# Altium PCB Solar_BMS.PcbDoc
Units mil, origin at the board's own origin, x right, y up, seen from the top; angles counter-clockwise.
Board outline 3690 x 1950 mil, 2 copper layers (Top Layer, Bottom Layer); 66 components, 54 nets, 227 pads, 0 vias.
Unrouted connection lines stored in the file: 132.
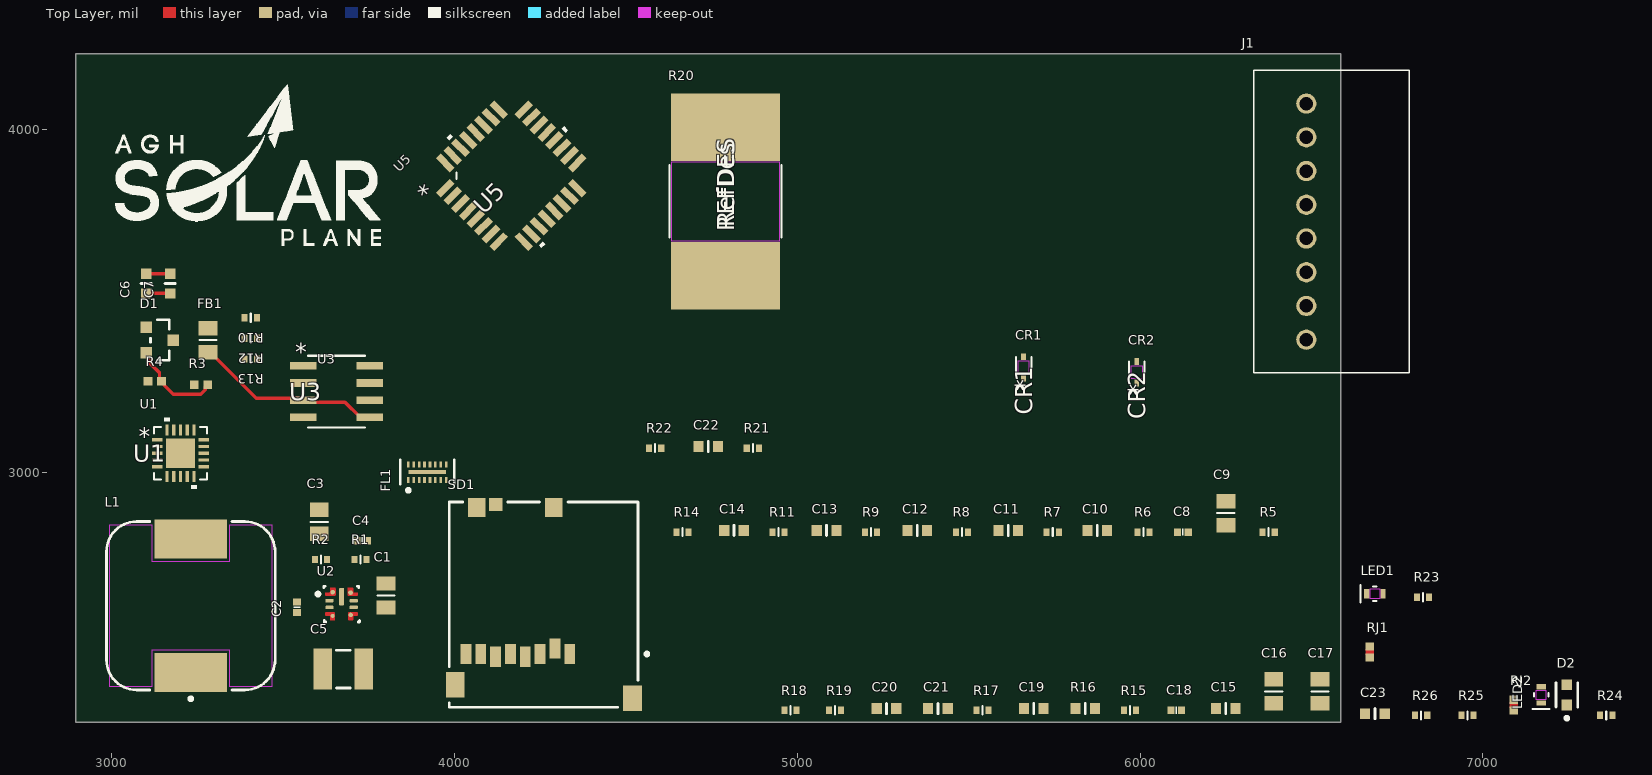
[diagram p0: Top Layer view]
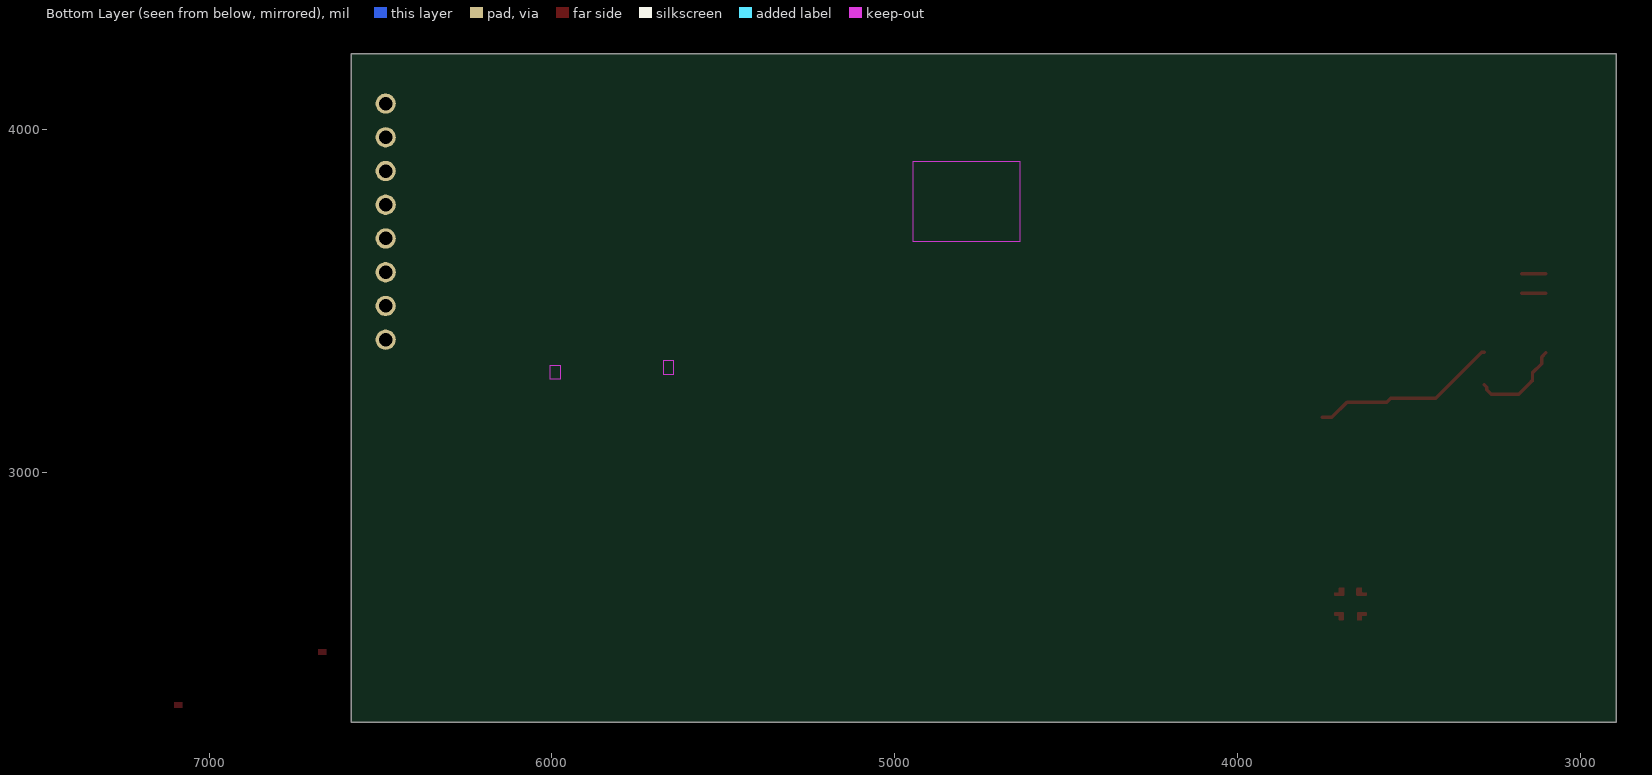
[diagram p1: Bottom Layer view, seen from below]

## Layer stack, top to bottom
Top Solder: solder mask 0.4, Solder Resist, Dk 3.5
Top Layer: signal copper 1.4
Dielectric 1: dielectric 12.6, FR-4, Dk 4.8
Bottom Layer: signal copper 1.4
Bottom Solder: solder mask 0.4, Solder Resist, Dk 3.5

## Board outline
2895,2270 2895,4220 6585,4220 6585,2270

## Design rules (kind name [scope] priority, off if disabled: settings)
Clearance [All] p1: gap=10 ignorepadtopadclearanceinfootprint=FALSE
PolygonConnect [All] p1: connectstyle=Relief reliefconductorwidth=10 reliefentries=4 polygonreliefangle="90 Angle" airgapwidth=10
RoutingVias [All] p1: holewidth=28 width=50 viastyle="Through Hole" minholewidth=28 minwidth=50 maxholewidth=28 maxwidth=50
SolderMaskExpansion [All] p1: expansion=0 istentingtop=FALSE
SupplyNets "Schematic Supply Nets_3" [InNet('VSS')] p1: voltage=0.000
SupplyNets "Schematic Supply Nets_2" [InNet('GND')] p2: voltage=0.000
SupplyNets "Schematic Supply Nets_1" [InNet('3v3')] p3: voltage=0.000
SupplyNets "Schematic Supply Nets" [InNet('VBAT')] p4: voltage=0.000
Width [All] p1: maxlimit=10 minlimit=10 preferedwidth=10
30 further rules are at their usual default settings.

## Classes and differential pairs
component class PowerSupply: C1 C2 C3 C4 C5 L1 LED1 R1 R2 R23 U2
component class Peripherals: C6 C7 C22 D1 FB1 FL1 R3 R21 R22 SD1 U3
component class MonitorSchDoc: C8 C9 C10 C11 C12 C13 C14 C15 C16 C17 C18 C19 C20 C21 CR1 CR2 J1 R4 R5 R6 R7 R8 R9 R10 R11 R12 R13 R14 R15 R16 R17 R18 R19 R20 RJ1 U1
component class MCU: C23 D2 LED2 R24 R25 R26 RJ2 U5

## Components (designator, comment, footprint, x,y, rotation, side; value= is the part's Value field where it differs from the comment)
C1 "Ceramic X7R" C_0805_2012 3800,2640 r90 top value=1uF
C2 "Ceramic X7R" C_0402_1005 3540,2605.35 r90 top value=100nF
C3 "Ceramic X7S" C_0805_2012 3605,2855 r90 top value=2.2uF
C4 "Ceramic X7R" C_0402_1005 3730,2800 r0 top value=100nF
C5 "Ceramic X7R" C_1210_3225 3675,2425 r0 top value=47uF
C6 "Ceramic X5R" C_0603_1608 3100,3550 r90 top value=22uF
C7 "Ceramic X7R" C_0603_1608 3170,3550 r90 top value=100nF
C8 "Ceramic C0G" C_0402_1005 6125,2825 r0 top value=100pF
C9 "Ceramic X7S" C_0805_2012 6250,2880 r90 top value=1uF
C10 "Ceramic X7R" C_0603_1608 5875,2830 r0 top value=220nF
C11 "Ceramic X7R" C_0603_1608 5615,2830 r0 top value=220nF
C12 "Ceramic X7R" C_0603_1608 5350,2830 r0 top value=220nF
C13 "Ceramic X7R" C_0603_1608 5085,2830 r0 top value=220nF
C14 "Ceramic X7R" C_0603_1608 4815,2830 r0 top value=220nF
C15 "Ceramic X7R" C_0603_1608 6250,2310 r0 top value=220nF
C16 "Ceramic X7S" C_0805_2012 6390,2360 r90 top value=1uF
C17 "Ceramic X7S" C_0805_2012 6525,2360 r90 top value=1uF
C18 "Ceramic C0G" C_0402_1005 6105,2305 r0 top value=100pF
C19 "Ceramic X7R" C_0603_1608 5690,2310 r0 top value=100nF
C20 "Ceramic X7R" C_0603_1608 5260,2310 r0 top value=220nF
C21 "Ceramic X7R" C_0603_1608 5410,2310 r0 top value=220nF
C22 "Ceramic X7R" C_0603_1608 4740,3075 r0 top value=10nF
C23 "Ceramic X7R" C_0603_1608 6685,2295 r0 top value=100nF
CR1 "ZHCS350TA" CR_350TA_DIO 5660,3305 r90 top
CR2 "ZHCS350TA" CR_350TA_DIO 5990,3291.44 r90 top
D1 "CDSOT23-SM712" FP-SOT23-MFG 3140,3385 r0 top value=75pF
D2 "VLMS1300-GS08" FP-6_541-5092_01-4-MFG 7245,2350 r90 top
FB1 "Ferrite bead" FB_0805_2012 3280,3385 r90 top value=11R@100M
FL1 "EMIF06-MSD02N16" FP-EMIF06-MSD02N16-MFG 3920,3000 r90 top
J1 "S8B-XH-A-1_LF__SN_" S8BXHA1LFSN 6485,3386.3 r90 top
L1 "Inductor" WE-PD_1210 3230,2610 r0 top value=33uH
LED1 "VLMTG1400-GS08" LED_400-GS08_VIS 6685,2645 r0 top
LED2 "VLMTG1400-GS08" LED_400-GS08_VIS 7170,2350 r90 top
R1 "Resistor" R_0402_1005 3725,2745 r0 top value=100k
R2 "Resistor" R_0402_1005 3610,2745 r0 top value=47k
R3 "Resistor 0R +/- 5% 0402 63 mW" RESC1005X40X25ML05T05 3260,3255 r0 top value=0
R4 "Resistor 0R +/- 5% 0402 63 mW" RESC1005X40X25ML05T05 3125,3265 r0 top value=0
R5 "Resistor" R_0402_1005 6375,2825 r0 top value=100R
R6 "Resistor" R_0402_1005 6010,2825 r0 top value=10R
R7 "Resistor" R_0402_1005 5745,2825 r0 top value=10R
R8 "Resistor" R_0402_1005 5480,2825 r0 top value=10R
R9 "Resistor" R_0402_1005 5215,2825 r0 top value=10R
R10 "Resistor" R_0402_1005 3405,3450 r180 top value=10k
R11 "Resistor" R_0402_1005 4945,2825 r0 top value=10R
R12 "Resistor" R_0402_1005 3405,3390 r180 top value=10k
R13 "Resistor" R_0402_1005 3405,3330 r180 top value=10k
R14 "Resistor" R_0402_1005 4665,2825 r0 top value=10R
R15 "Resistor" R_0402_1005 5970,2305 r0 top value=10R
R16 "Resistor" R_0603_1608 5840,2310 r0 top value=110k
R17 "Resistor" R_0402_1005 5540,2305 r0 top value=10R
R18 "Resistor" R_0402_1005 4980,2305 r0 top value=100R
R19 "Resistor" R_0402_1005 5110,2305 r0 top value=100R
R20 "LRMAP5930B-R0006FT" RES_R0006FT_WEL 4790,3790 r90 top
R21 "Resistor" R_0402_1005 4870,3070 r0 top value=62R
R22 "Resistor" R_0402_1005 4585,3070 r0 top value=62R
R23 "Resistor" R_0402_1005 6825,2635 r0 top value=1k
R24 "Resistor" R_0402_1005 7360,2290 r0 top value=330R
R25 "Resistor" R_0402_1005 6955,2290 r0 top value=330R
R26 "Resistor" R_0402_1005 6820,2290 r0 top value=100k
RJ1 "Net Tie 12x8mil" SHORT06-FP 6670,2475 r90 top net-tie
RJ2 "Net Tie 12x8mil" SHORT06-FP 7090,2320 r90 top net-tie
SD1 "473521001" MOLX-473521001_V 4259.53,2613.46 r0 top
U1 "BQ76907RGRR" VQFN20_RGR_TEX 3200,3055 r0 top
U2 "LMR36506RS3QRPERQ1" FP-RPE0009A-MFG 3670,2615 r0 top
U3 "TCAN3413DR" SOIC-8_D0008A_TEX 3655,3235 r0 top
U5 "STM32G431KBT3" LQFP-32_STM 4165,3865 r45 top

## Footprints (in the part's own frame and the unit in brackets; to place one, negate y for a bottom-side part, rotate by r counter-clockwise, add the part's x,y. Pads: shape width x height; smd on the part's side, far side on the other; paste and mask are expansions set on the pad)
C_0402_1005 [mm]
  rect 0.52x0.56 smd: 1(-0.39,0) 2(0.39,0)
  silkscreen extent 0,-0.25 0,0.25, body extent -0.52,-0.27 0.53,0.28, height 0.55
C_0603_1608 [mm]
  rect 0.75x0.8 smd: 1(-0.725,0) 2(0.725,0)
  silkscreen extent 0,-0.38 0,0.38, body extent -0.85,-0.45 0.85,0.45, height 0.89
C_0805_2012 [mil]
  rect 42x55 smd: 1(-35,0) 2(35,0)
  silkscreen extent 0,-25 0,25, body extent -43,-29 43,29, height 53
C_1210_3225 [mil]
  rect 54x120 smd: 1(-60,0) 2(60,0)
  silkscreen extent -20,-55 20,55, body extent -72,-55 70,55, height 106
CR_350TA_DIO [mil]
  rect 19.87x14 smd paste+0 mask+0: 1(-31.44,0) 2(31.44,0)
  Top Layer keep-out region: -19.5,-15.5 -19.5,15.5 19.5,15.5 19.5,-15.5
  Keep-Out Layer region: -19.5,-15.5 -19.5,15.5 19.5,15.5 19.5,-15.5
  silkscreen extent -30,-23 30,23, body extent -34,-17 34,17, height 26
FB_0805_2012 [mil]
  rect 42x55 smd: 1(-35,0) 2(35,0)
  silkscreen extent 0,-25 0,25, body extent -39,-24 39,24, height 35
FP-6_541-5092_01-4-MFG [mm]
  rect 0.8x0.8 smd paste+0 mask+0: 1(-0.75,0) 2(0.75,0)
  silkscreen extent -1.85,-0.8 0.9,0.8, body extent -1.25,-0.6 1.25,0.6, height 0.25
FP-EMIF06-MSD02N16-MFG [mm]
  rect 0.45x0.2 smd paste-1000 mask+0: 1(-0.575,1.4) 2(-0.575,1) 3(-0.575,0.6) 4(-0.575,0.2) 5(-0.575,-0.2) 6(-0.575,-0.6) 7(-0.575,-1) 8(-0.575,-1.4) 9(0.575,-1.4) 10(0.575,-1) 11(0.575,-0.6) 12(0.575,-0.2) 13(0.575,0.2) 14(0.575,0.6) 15(0.575,1) 16(0.575,1.4)
  rect 0.3x2.8 smd paste-1000 mask+0: 17(0,0)
  silkscreen extent -1.47,-2 0.9,2, body extent -0.9,-1.88 0.9,1.88, height 0.25
FP-RPE0009A-MFG [mm]
  round 0.342 smd paste-1000 mask+0: 1(-0.661,0.877)
  rrect40% 0.6x0.25 smd paste+0 mask+0: 2(-0.9,0.25) 3(-0.9,-0.25) 6(0.9,-0.25) 7(0.9,0.25)
  round 0.291 smd paste+0 mask+0: 4(-0.661,-0.877)
  round 0.323 smd paste+0 mask+0: 5(0.68,-0.805)
  round 0.346 smd paste-1000 mask+0: 8(0.665,0.841)
  rrect29% 0.35x1.3 smd paste-1000 mask+0: 9(0,0.55)
  Top Layer region: 1.2,0.8 1.193,0.825 1.175,0.844 1.15,0.85 1.15,0.85 0.9,0.851 0.881,0.854 0.865,0.865 0.854,0.881 0.85,0.901 0.85,0.901 0.85,1.15 0.843,1.175 0.825,1.193 0.8,1.2 0.8,1.2 0.5,1.2 0.481,1.196 0.465,1.185 0.454,1.169 0.45,1.15 0.45,1.15 0.45,0.676 0.454,0.656 0.465,0.64 0.481,0.629 0.5,0.626 0.5,0.625 1.15,0.626 1.169,0.629 1.185,0.64 1.196,0.656 1.2,0.676 1.2,0.676
  Top Layer region: 1.2,-0.8 1.193,-0.825 1.175,-0.844 1.15,-0.85 1.15,-0.851 0.9,-0.85 0.881,-0.854 0.865,-0.865 0.854,-0.881 0.85,-0.9 0.85,-0.901 0.85,-1.15 0.843,-1.175 0.825,-1.193 0.8,-1.2 0.8,-1.2 0.55,-1.2 0.531,-1.196 0.515,-1.185 0.504,-1.169 0.5,-1.15 0.5,-1.15 0.5,-0.676 0.504,-0.656 0.515,-0.64 0.531,-0.629 0.55,-0.625 0.55,-0.625 1.15,-0.626 1.169,-0.629 1.185,-0.64 1.196,-0.656 1.2,-0.676 1.2,-0.676
  Top Layer region: -1.2,-0.8 -1.193,-0.825 -1.175,-0.844 -1.15,-0.85 -1.15,-0.85 -0.9,-0.851 -0.881,-0.854 -0.865,-0.865 -0.854,-0.881 -0.85,-0.901 -0.85,-0.901 -0.85,-1.15 -0.843,-1.175 -0.825,-1.193 -0.8,-1.2 -0.8,-1.2 -0.55,-1.2 -0.531,-1.196 -0.515,-1.185 -0.504,-1.169 -0.5,-1.15 -0.5,-1.15 -0.5,-0.676 -0.504,-0.656 -0.515,-0.64 -0.531,-0.629 -0.55,-0.626 -0.55,-0.625 -1.15,-0.626 -1.169,-0.629 -1.185,-0.64 -1.196,-0.656 -1.2,-0.676 -1.2,-0.676
  Top Layer region: -1.2,0.8 -1.193,0.825 -1.175,0.844 -1.15,0.85 -1.15,0.851 -0.9,0.851 -0.881,0.854 -0.865,0.865 -0.854,0.881 -0.85,0.901 -0.85,0.901 -0.85,1.15 -0.843,1.175 -0.825,1.193 -0.8,1.2 -0.8,1.2 -0.5,1.2 -0.481,1.196 -0.465,1.185 -0.454,1.169 -0.45,1.15 -0.45,1.15 -0.45,0.676 -0.454,0.656 -0.465,0.64 -0.481,0.629 -0.5,0.626 -0.5,0.625 -1.15,0.626 -1.169,0.629 -1.185,0.64 -1.196,0.656 -1.2,0.676 -1.2,0.676
  silkscreen extent -1.87,-1.33 1.33,1.33, body extent -1.3,-1.3 1.3,1.3, height 0.25
FP-SOT23-MFG [mm]
  rect 0.85x0.85 smd paste+0 mask+0: 1(-1,0.95) 2(-1,-0.95) 3(1,0)
  silkscreen extent -0.7,-1.5 0.7,1.5, body extent -1.53,-1.6 1.53,1.6, height 0.25
LED_400-GS08_VIS [mil]
  rect 15.5x28 smd paste+0 mask+0: 1(-23.75,0) 2(23.75,0)
  Top Layer keep-out region: -14,-14 -14,14 14,14 14,-14
  silkscreen extent -42,-25 5,25, body extent -31,-16 31,16, height 22
LQFP-32_STM [mil]
  rect 58x20 smd paste-29 mask-29: 1(-162,110.24) 2(-162,78.74) 3(-162,47.24) 4(-162,15.75) 5(-162,-15.75) 6(-162,-47.24) 7(-162,-78.74) 8(-162,-110.24) 17(162,-110.24) 18(162,-78.74) 19(162,-47.24) 20(162,-15.75) 21(162,15.75) 22(162,47.24) 23(162,78.74) 24(162,110.24)
  rect 20x58 smd paste-29 mask-29: 9(-110.24,-162) 10(-78.74,-162) 11(-47.24,-162) 12(-15.75,-162) 13(15.75,-162) 14(47.24,-162) 15(78.74,-162) 16(110.24,-162) 25(110.24,162) 26(78.74,162) 27(47.24,162) 28(15.75,162) 29(-15.75,162) 30(-47.24,162) 31(-78.74,162) 32(-110.24,162)
  silkscreen extent -120,-211 211,211, body extent -177,-177 177,177, height 63
MOLX-473521001_V [mm] "SMD, 8-Leads, Body 15.2x14mm, Pitch 1.1mm"
  rect 0.8x1.5 smd: 1(1.94,-3.66) 2(0.84,-3.26) 3(-0.26,-3.66) 4(-1.36,-3.86) 5(-2.46,-3.66) 6(-3.56,-3.86) 7(-4.66,-3.66) 8(-5.76,-3.66)
  rect 1x0.95 smd: 9(-3.56,7.425)
  rect 1.3x1.4 smd: 10(-4.95,7.2) 11(0.75,7.2)
  rect 1.4x1.9 smd: 12(6.6,-6.95) 13(-6.55,-5.95)
  silkscreen extent -7,-7.6 7.78,7.6, body extent -7.05,-7.6 7.05,7.6, height 1.85
R_0402_1005 [mm] "Chip Resistor, 2-Leads, Body 1.00x0.50mm, IPC High Density"
  rect 0.45x0.55 smd: 1(-0.45,0) 2(0.45,0)
  silkscreen extent 0,-0.3 0,0.3, body extent -0.53,-0.28 0.53,0.28, height 0.37
R_0603_1608 [mm]
  rect 0.75x0.8 smd: 1(-0.725,0) 2(0.725,0)
  silkscreen extent 0,-0.38 0,0.38, body extent -0.87,-0.47 0.88,0.48, height 0.54
RES_R0006FT_WEL [mil]
  rect 197x319 smd paste+0 mask+0: 1(-216.5,0) 2(216.5,0)
  Keep-Out Layer region: -116,-156.5 -116,156.5 116,156.5 116,-156.5
  silkscreen extent -106,-164 106,164, body extent -301,-159 301,159, height 18
RESC1005X40X25ML05T05 [mm] "Chip Resistor, 2-Leads, Body 1.05x0.55mm, IPC Low Density"
  rect 0.65x0.65 smd: 1(-0.5,0) 2(0.5,0)
  body extent -0.53,-0.28 0.53,0.28, height 0.4
S8BXHA1LFSN [mm]
  round 1.5 hole 1: 1(0,0) 2(2.5,0) 3(5,0) 4(7.5,0) 5(10,0) 6(12.5,0) 7(15,0) 8(17.5,0)
  silkscreen extent -2.45,-7.62 19.95,3.9, body extent -2.45,-7.6 19.95,3.9, height 6.2
SHORT06-FP [mm]
  rect 0.6x0.6 smd paste-0.4 mask+0.102: 1(-0.4,0) 2(0.4,0)
  Top Layer region: -0.2,0.3 -0.2,-0.3 0.2,-0.3 0.2,0.3
SOIC-8_D0008A_TEX [mil]
  rect 78x22 smd paste+0 mask+0: 1(-97,75) 2(-97,25) 3(-97,-25) 4(-97,-75) 5(97,-75) 6(97,-25) 7(97,25) 8(97,75)
  silkscreen extent -84,-104 84,104, body extent -122,-99 122,99, height 69
VQFN20_RGR_TEX [mil]
  rect 31.81x10.03 smd paste+0 mask+0: 1(-67.91,39.38) 2(-67.91,19.69) 3(-67.91,0) 4(-67.91,-19.69) 5(-67.91,-39.38) 11(67.91,-39.38) 12(67.91,-19.69) 13(67.91,0) 14(67.91,19.69) 15(67.91,39.38)
  rect 10.03x31.81 smd paste+0 mask+0: 6(-39.38,-67.91) 7(-19.69,-67.91) 8(0,-67.91) 9(19.69,-67.91) 10(39.38,-67.91) 16(39.38,67.91) 17(19.69,67.91) 18(0,67.91) 19(-19.69,67.91) 20(-39.38,67.91)
  rect 85x85 smd paste+0 mask+0: 21(0,0)
  silkscreen extent -77,-104 77,104, body extent -72,-72 72,72, height 39
WE-PD_1210 [mm] "SMT Shielded Power Inductor, 2-leads, body 12x12mm"
  rect 5.4x2.9 smd: 1(0,-4.95) 2(0,4.95)
  Top Layer keep-out region: -6,6 -2.9,6 -2.9,3.3 2.9,3.3 2.9,6 6,6 6,-6 2.9,-6 2.9,-3.3 -2.9,-3.3 -2.9,-6 -6,-6
  silkscreen extent -6.25,-7.02 6.25,6.25, body extent -6,-6 6,6, height 9.46

## Part data
C1: library part C_1uF_50V_X7R_0805_10, "Capacitor", Dielectric=X7R, Manufacturer=AVX, Manufacturer Part Number=08055C105KAT2A, Tolerance (%)=10, Voltage=50V, HelpURL=https://sigma.octopart.com/147443767/technical_drawing/AVX-08055C105KAT2A.pdf, Part Number=C_1uF_50V_X7R_0805_10, SCH_Footprint=0805, Supplier 1=TME, Supplier 2="RS Components", Supplier 3=Farnell, Supplier 4=Mouser, Supplier 5=Digi-Key, Supplier 6=LCSC, Supplier Part Number 1=08055C105KAT2A, Supplier Part Number 2=1441427, Supplier Part Number 3=2094043, Supplier Part Number 4=581-08055C105KAT2A, Supplier Part Number 5=478-7956-1-ND
C2 C4: library part C_100nF_50V_X7R_0402_10, "Capacitor", Dielectric=X7R, Manufacturer=Murata, Manufacturer Part Number=GRM155R71H104KE14D, Tolerance (%)=10, Voltage=50V, HelpURL=http://docs-europe.electrocomponents.com/webdocs/145f/0900766b8145f9d2.pdf, Part Number=C_100nF_50V_X7R_0402_10, SCH_Footprint=0402, Supplier 1=TME, Supplier 2="RS Components", Supplier 3=Farnell, Supplier 4=Mouser, Supplier 5=Digi-Key, Supplier 6=LCSC, Supplier Part Number 1=GRM155R71H104KE14D, Supplier Part Number 2=8847087, Supplier Part Number 3=2611912, Supplier Part Number 4=81-GRM155R71H104KE4D, Supplier Part Number 5=490-10700-1-ND
C3: library part C_2.2uF_35V_X7S_0805_10_AECQ1, "Capacitor", Dielectric=X7S, Manufacturer=Murata, Manufacturer Part Number=GCM21BC7YA225KE02, Supplier Part Number 1=GCM21BC7YA225KE02L, Tolerance (%)=10, Voltage=35V, AEC-Q=1, HelpURL=https://www.murata.com/products/productdetail?partno=GCM21BC7YA225KE02%23, Part Number=C_2.2uF_35V_X7S_0805_10_AECQ1, SCH_Footprint=0805, Supplier 1=TME, Supplier 2="RS Components", Supplier 3=Farnell, Supplier 4=Mouser, Supplier 5=Digi-Key, Supplier 6=LCSC, Supplier Part Number 3=3784380, Supplier Part Number 4=81-GCM21BC7YA225KE2L, Supplier Part Number 5=490-16390-1-ND, Supplier Part Number 6=C389007
C5: library part C_47uF_10V_X7R_1210_20, "Capacitor", Dielectric=X7R, Manufacturer=Murata, Manufacturer Part Number=GRM32ER71A476ME15L, Tolerance (%)=20, Voltage=10V, HelpURL=http://www.mouser.com/ds/2/281/c02e-2905.pdf, Part Number=C_47uF_10V_X7R_1210_20, SCH_Footprint=1210, Supplier 1=TME, Supplier 2="RS Components", Supplier 3=Farnell, Supplier 4=Mouser, Supplier 5=Digi-Key, Supplier 6=LCSC, Supplier Part Number 1=GRM32ER71A476ME15L, Supplier Part Number 2=8202908, Supplier Part Number 3=2362130, Supplier Part Number 4=81-GRM32ER71A476ME5L, Supplier Part Number 5=490-6543-1-ND
C6: library part C_22uF_10V_X5R_0603_20, "Capacitor", Dielectric=X5R, Manufacturer=Murata, Manufacturer Part Number=GRM188R61A226ME15D, Tolerance (%)=20, Voltage=10V, HelpURL=https://www.mouser.pl/datasheet/2/281/1/GRM188R61A226ME15_02A-1985787.pdf, Part Number=C_22uF_10V_X5R_0603_20, SCH_Footprint=0603, Supplier 1=TME, Supplier 2="RS Components", Supplier 3=Farnell, Supplier 4=Mouser, Supplier 5=Digi-Key, Supplier 6=LCSC, Supplier Part Number 1=GRM188R61A226ME15D, Supplier Part Number 3=2426957, Supplier Part Number 4=81-GRM188R61A226ME5D, Supplier Part Number 5=490-10476-1-ND
C7 C23: library part C_100nF_50V_X7R_0603_10_AECQ1, "Capacitor", Dielectric=X7R, Manufacturer=Murata, Manufacturer Part Number=GCM188R71H104KA57D, Tolerance (%)=10, Voltage=50V, AEC-Q=1, HelpURL=https://www.murata.com/products/productdetail?partno=GCM188R71H104KA57%23, Part Number=C_100nF_50V_X7R_0603_10_AECQ1, SCH_Footprint=0603, Supplier 1=TME, Supplier 2="RS Components", Supplier 3=Farnell, Supplier 4=Mouser, Supplier 5=Digi-Key, Supplier 6=LCSC, Supplier Part Number 1=GCM188R71H104KA57D, Supplier Part Number 3=4360223, Supplier Part Number 4=81-GCM188R71H104KA7D, Supplier Part Number 5=490-4779-1-ND, Supplier Part Number 6=C85864
C8 C18: library part C_100pF_50V_C0G_0402_5, "Capacitor", Dielectric=C0G, Manufacturer=Murata, Manufacturer Part Number=GRM1555C1H101JA01D, Tolerance (%)=5, Voltage=50V, HelpURL=http://www.tme.eu/en/Document/e3e731e59cc68b1ab6d46b158bb05733/MURATA_GRM.pdf, Part Number=C_100pF_50V_C0G_0402_5, SCH_Footprint=0402, Supplier 1=TME, Supplier 2="RS Components", Supplier 3=Farnell, Supplier 4=Mouser, Supplier 5=Digi-Key, Supplier 6=LCSC, Supplier Part Number 1=GRM1555C1H101JA01D, Supplier Part Number 2=7235363, Supplier Part Number 3=2218836, Supplier Part Number 4=81-GRM1555C1H101JA1D, Supplier Part Number 5=490-5922-1-ND
C9 C16 C17: library part C_1uF_100V_X7S_0805_10_AECQ1, "Capacitor", Dielectric=X7S, Manufacturer=Murata, Manufacturer Part Number=GCM21BC72A105KE36, Supplier Part Number 1=GCM21BC72A105KE36L, Tolerance (%)=10, Voltage=100V, AEC-Q=1, HelpURL=https://www.murata.com/products/productdetail?partno=GCM21BC72A105KE36%23, Part Number=C_1uF_100V_X7S_0805_10_AECQ1, SCH_Footprint=0805, Supplier 1=TME, Supplier 2="RS Components", Supplier 3=Farnell, Supplier 4=Mouser, Supplier 5=Digi-Key, Supplier 6=LCSC, Supplier Part Number 3=3243166, Supplier Part Number 4=81-GCM21BC72A105KE6L, Supplier Part Number 5=490-14436-1-ND, Supplier Part Number 6=C126585
C10 C11 C12 C13 C14 C15 C20 C21: library part C_220nF_50V_X7R_0603_10_AECQ1, "Capacitor", Dielectric=X7R, Manufacturer=Murata, Manufacturer Part Number=GCM188R71H224KA64J, Tolerance (%)=10, Voltage=50V, AEC-Q=1, HelpURL=https://www.murata.com/products/productdetail?partno=GCM188R71H224KA64%23, Part Number=C_220nF_50V_X7R_0603_10_AECQ1, SCH_Footprint=0603, Supplier 1=TME, Supplier 2="RS Components", Supplier 3=Farnell, Supplier 4=Mouser, Supplier 5=Digi-Key, Supplier 6=LCSC, Supplier Part Number 1=GCM188R71H224KA64J, Supplier Part Number 3=3790391, Supplier Part Number 4=81-GCM188R71H224KA4J, Supplier Part Number 5=490-13307-1-ND, Supplier Part Number 6=C2169489
C19: library part C_100nF_100V_X7R_0603_10, "Capacitor", Dielectric=X7R, Manufacturer=Kemet, Manufacturer Part Number=C0603X104K1RACTU, Tolerance (%)=10, Voltage=100V, HelpURL=https://www.mouser.pl/datasheet/2/447/KEM_C1013_X7R_FT_CAP_SMD-3316633.pdf, Part Number=C_100nF_100V_X7R_0603_10, SCH_Footprint=0603, Supplier 1=TME, Supplier 2="RS Components", Supplier 3=Farnell, Supplier 4=Mouser, Supplier 5=Digi-Key, Supplier 6=LCSC, Supplier Part Number 3=4380077, Supplier Part Number 4=80-C0603X104K1RACTU, Supplier Part Number 5=399-C0603X104K1RACTUCT-ND
C22: library part C_10nF_100V_X7R_0603_10_AECQ1, "Capacitor", Dielectric=X7R, Manufacturer=Murata, Manufacturer Part Number=GCM188R72A103KA37J, Tolerance (%)=10, Voltage=100V, AEC-Q=1, HelpURL=https://www.murata.com/products/productdetail?partno=GCM188R72A103KA37%23, Part Number=C_10nF_100V_X7R_0603_10_AECQ1, SCH_Footprint=0603, Supplier 1=TME, Supplier 2="RS Components", Supplier 3=Farnell, Supplier 4=Mouser, Supplier 5=Digi-Key, Supplier 6=LCSC, Supplier Part Number 1=GCM188R72A103KA37J, Supplier Part Number 3=3790392, Supplier Part Number 4=81-GCM188R72A103KA7J, Supplier Part Number 5=490-8028-1-ND
CR1 CR2: "Description", Manufacturer_Name="Diodes Inc", Copyright="Copyright (C) 2026 Ultra Librarian. All rights reserved.", Manufacturer_Part_Number=ZHCS350TA
D1: library part CMP-2000-05081-2, "TVS DIODE 7V/12V 14V/26V SOT23-3", Breakdown Voltage=7.5V, Capacitance=75pF, Clamping Voltage=26V, Manufacturer="Bourns Inc.", Package=SOT23, Peak Pulse Current=17A, Peak Pulse Power=400W, Reverse Standoff Voltage=12V, Temperature="-55°C to +150°C", Temperature Range High=+150°C, Temperature Range Low=-55°C, Automotive=No, Category=Diode, ComponentLink2Description=Datasheet, ComponentLink2URL=https://www.bourns.com/docs/Product-Datasheets/CDSOT23-SM712.pdf, Device Class L1="Circuit Protection", Device Class L2="TVS Diodes", Device Class L3=unset, Digikey Description="TVS DIODE 7V/12V 14V/26V SOT23-3", Direction=Bidirectional, Height=1.17mm, Ipc Land Pattern Name=SOT95P229X103-3, Lead Free=Yes, Manufacturer Part Number=CDSOT23-SM712, Mouser Description="Transient Voltage Suppressor, TVS, CDSOT23 Series, Unidirectional, 12 V, SOT-23, 3, 13.3 V", Number Of Channels=2, Octopart=https://octopart.com/cdsot23-sm712-bourns-7576327, RoHS=TRUE, Standoff Height=0.05mm
D2: library part CMP-02520-000012-1, "LED RED 0603 SMD", Ambient Temperature Range High=+85°C, Ambient Temperature Range Low=-35°C, Colour=Red, Forward Current=20mA, Forward Voltage=2V, Manufacturer=Vishay, Package=6.541-5092.01-4, Power Dissipation=75mW, Reverse Voltage=5V, Temperature="-35°C to +85°C", Automotive=No, Category=Diode, ComponentLink2Description=Datasheet, ComponentLink2URL=http://www.vishay.com/docs/82437/vlmo1300.pdf, Device Class L1=Optoelectronics, Device Class L2=LEDs, Device Class L3=unset, Digikey Description="LED RED 0603 SMD", Height=1mm, Lead Free=Yes, Led Orientation="Top View", Luminous Intensity=54mcd, Manufacturer Part Number=VLMS1300-GS08, Mouser Description="Standard LEDs - SMD Super Red Clear Non-Diff", Octopart=https://octopart.com/vlms1300-gs08-vishay-21709201, Peak Emmision Wavelength=639nm, RoHS=TRUE, Temperature Range High=+85°C, Temperature Range Low=-35°C, Viewing Angle=130°, Wavelength=631nm
FB1: library part FB_2508051107Y0, "Ferrite Bead", Current=300mA, Manufacturer=Fair-Rite, Manufacturer Part Number=2508051107Y0, Resistance=100mR, HelpURL=https://datasheet.octopart.com/2508051107Y0-Fair-Rite-datasheet-834.pdf, Part Number=FB_2508051107Y0, SCH_Footprint=0805, Supplier 1=TME, Supplier 2="RS Components", Supplier 3=Farnell, Supplier 4=Mouser, Supplier 5=Digi-Key, Supplier 6=LCSC, Supplier Part Number 3=1612004, Supplier Part Number 4=623-2508051107Y0, Supplier Part Number 5=1934-1397-1-ND
FL1: library part CMP-12221-000004-1, "FILTER RC(PI) 45 OHM/20PF SMD", Breakdown Voltage=8V, Capacitance=20pF, Case/Package=QFN, Max Operating Temperature=85°C, Min Operating Temperature=-30°C, Package Quantity=1, Contact Plating=Gold, Depth=1.25mm, ESD Protection=Yes, Height=0.022inch, Lead Free="Lead Free", Length=3.55mm, Max Breakdown Voltage=8V, Mount="Surface Mount", Number Of Channels=6, Number of Pins=16, Packaging="Tape and Reel", Radiation Hardening=No, REACH SVHC="No SVHC", Termination=Flat, Width=0.047inch
J1: "Connector", Arrow Part Number=S8B-XH-A-1(LF)(SN), Manufacturer_Name="JST (JAPAN SOLDERLESS TERMINALS)", Mouser Part Number=306-S8BXHA1LFSN, Arrow Price/Stock=https://www.arrow.com/en/products/s8b-xh-a-1-lf-sn/jst-manufacturing?region=europe, Datasheet Link=http://www.jst-mfg.com/product/pdf/eng/eXH.pdf, Height=6.1mm, Manufacturer_Part_Number=S8B-XH-A-1(LF)(SN), Mouser Price/Stock=https://www.mouser.co.uk/ProductDetail/JST-Commercial/S8B-XH-A-1LFSN?qs=QpmGXVUTftFKLlmLzIYjBQ%3D%3D
L1: library part L_33uH_4.2A_WE-PD, "Induction", Current=4.2A, Manufacturer=Wurth, Manufacturer Part Number=7447709330, Resistance=37mR, HelpURL=https://www.we-online.com/components/products/datasheet/7447709330.pdf, Part Number=L_33uH_4.2A_WE-PD, SCH_Footprint=WE-PD, Supplier 1=TME, Supplier 2="RS Components", Supplier 3=Farnell, Supplier 4=Mouser, Supplier 5=Digi-Key, Supplier 6=LCSC, Supplier Part Number 2=70996773, Supplier Part Number 3=2082654, Supplier Part Number 4=710-7447709330, Supplier Part Number 5=732-1244-1-ND
LED1 LED2: "CHIPLED (0603) TRUEGREEN HIGHBRIGHT -e4", Manufacturer_Name=Vishay, Copyright="Copyright (C) 2025 Ultra Librarian. All rights reserved.", Manufacturer_Part_Number=VLMTG1400-GS08
R1 R26: library part R_100k_0402_1, Manufacturer=Yageo, Manufacturer Part Number=RC0402FR-07100KL, Power=63mW, Supplier Part Number 1=RC0402FR-07100K, Tolerance=1%, Voltage=50V, HelpURL=http://www.tme.eu/pl/Document/1a2bc76e2be68b3b1670068306778ce6/rc0402yageo.pdf, Part Number=R_100k_0402_1, SCH_Footprint=0402, Supplier 1=TME, Supplier 2="RS Components", Supplier 3=Farnell, Supplier 4=Mouser, Supplier 5=Digi-Key, Supplier 6=LCSC, Supplier Part Number 3=2131798, Supplier Part Number 4=603-RC0402FR-07100KL, Supplier Part Number 5=311-100KLRCT-ND
R2: library part R_47k_0402_1, Manufacturer=Yageo, Manufacturer Part Number=RC0402FR-0747KL, Power=63mW, Tolerance=1%, Voltage=50V, HelpURL=https://datasheet.octopart.com/RC0402FR-0747KL-Yageo-datasheet-10408619.pdf, Part Number=R_47k_0402_1, SCH_Footprint=0402, Supplier 1=TME, Supplier 2="RS Components", Supplier 3=Farnell, Supplier 4=Mouser, Supplier 5=Digi-Key, Supplier 6=LCSC, Supplier Part Number 1=RC0402FR-0747KL, Supplier Part Number 3=2421898, Supplier Part Number 4=603-RC0402FR-0747KL, Supplier Part Number 5=311-47.0KLRCT-ND
R3 R4: library part CMP-009-00003-5, "Chip Resistor, 0 Ohm, +/- 5%, 63 mW, -55 to 155 degC, 0402 (1005 Metric)", Case/Package=0402, Max Operating Temperature=155°C, Min Operating Temperature=-55°C, Power=63mW, Tolerance=5%, Voltage Rating=50V, Mounting Technology=SM, Pins=2, RoHS Compliant=True
R5 R18 R19: library part R_100R_0402_1_AECQ0, Manufacturer=Panasonic, Manufacturer Part Number=ERJ-2RKF1000X, Power=100mW, Supplier Part Number 1=ERJ2RKF1000X, Tolerance=1%, Voltage=50V, AEC-Q=0, HelpURL=https://industrial.panasonic.com/cdbs/www-data/pdf/RDA0000/AOA0000C304.pdf, Part Number=R_100R_0402_1_AECQ0, SCH_Footprint=0402, Supplier 1=TME, Supplier 2="RS Components", Supplier 3=Farnell, Supplier 4=Mouser, Supplier 5=Digi-Key, Supplier 6=LCSC, Supplier Part Number 3=2302528, Supplier Part Number 4=667-ERJ-2RKF1000X, Supplier Part Number 5=P100LCT-ND
R6 R7 R8 R9 R11 R14 R15 R17: library part R_10R_0402_1, Manufacturer=Yageo, Manufacturer Part Number=RC0402FR-0710R, Power=63mW, Tolerance=1%, Voltage=50V, HelpURL=http://www.tme.eu/pl/Document/1a2bc76e2be68b3b1670068306778ce6/rc0402yageo.pdf, Part Number=R_10R_0402_1, SCH_Footprint=0402, Supplier 1=TME, Supplier 2="RS Components", Supplier 3=Farnell, Supplier 4=Mouser, Supplier 5=Digi-Key, Supplier 6=LCSC, Supplier Part Number 1=RC0402FR-0710R, Supplier Part Number 2=6185848, Supplier Part Number 3=2128710, Supplier Part Number 4=603-RC0402FR-0710RL, Supplier Part Number 5=311-10.0LRCT-ND
R10 R12 R13: library part R_10k_0402_1, Manufacturer=Yageo, Manufacturer Part Number=RC0402FR-0710KL, Power=63mW, Supplier Part Number 1=RC0402FR-0710K, Tolerance=1%, Voltage=50V, HelpURL=http://www.tme.eu/pl/Document/1a2bc76e2be68b3b1670068306778ce6/rc0402yageo.pdf, Part Number=R_10k_0402_1, SCH_Footprint=0402, Supplier 1=TME, Supplier 2="RS Components", Supplier 3=Farnell, Supplier 4=Mouser, Supplier 5=Digi-Key, Supplier 6=LCSC
R16: library part R_110k_0603_1, Manufacturer=Royalohm, Manufacturer Part Number=0603SAF1103T5E, Power=100mW, Supplier Part Number 1=SMD0603-110K-1%, Tolerance=1%, Voltage=50V, HelpURL=http://www.tme.eu/pl/Document/9e42ba54d36a9bd3dfa2901986ac022d/rezystor-smd.pdf, Part Number=R_110k_0603_1, SCH_Footprint=0603, Supplier 1=TME, Supplier 2="RS Components", Supplier 3=Farnell, Supplier 4=Mouser, Supplier 5=Digi-Key, Supplier 6=LCSC, Supplier Part Number 3=2845762
R20: "Description", Manufacturer_Name="TT Electronics", Copyright="Copyright (C) 2025 Ultra Librarian. All rights reserved.", Manufacturer_Part_Number=LRMAP5930B-R0006FT
R21 R22: library part R_62R_0402_1_AECQ0, Manufacturer=Panasonic, Manufacturer Part Number=ERJ-2RKF62R0X, Power=100mW, Supplier Part Number 1=ERJ2RKF62R0X, Tolerance=1%, Voltage=50V, AEC-Q=0, HelpURL=https://industrial.panasonic.com/cdbs/www-data/pdf/RDA0000/AOA0000C304.pdf, Part Number=R_62R_0402_1_AECQ0, SCH_Footprint=0402, Supplier 1=TME, Supplier 2="RS Components", Supplier 3=Farnell, Supplier 4=Mouser, Supplier 5=Digi-Key, Supplier 6=LCSC, Supplier Part Number 3=4137006, Supplier Part Number 4=667-ERJ-2RKF62R0X, Supplier Part Number 5=P62.0LCT-ND
R23: library part R_1k_0402_1, Manufacturer=Yageo, Manufacturer Part Number=RC0402FR-071K, Power=63mW, Tolerance=1%, Voltage=50V, HelpURL=http://www.tme.eu/pl/Document/1a2bc76e2be68b3b1670068306778ce6/rc0402yageo.pdf, Part Number=R_1k_0402_1, SCH_Footprint=0402, Supplier 1=TME, Supplier 2="RS Components", Supplier 3=Farnell, Supplier 4=Mouser, Supplier 5=Digi-Key, Supplier 6=LCSC, Supplier Part Number 1=RC0402FR-071K, Supplier Part Number 3=9239235, Supplier Part Number 4=603-RC0402FR-071KP, Supplier Part Number 5=311-1.00KLRCT-ND
R24 R25: library part R_330R_0402_1_AECQ0, Manufacturer=Panasonic, Manufacturer Part Number=ERJ-2RKF3300X, Power=100mW, Supplier Part Number 1=ERJ2RKF3300X, Tolerance=1%, Voltage=50V, AEC-Q=0, HelpURL=https://industrial.panasonic.com/cdbs/www-data/pdf/RDA0000/AOA0000C304.pdf, Part Number=R_330R_0402_1_AECQ0, SCH_Footprint=0402, Supplier 1=TME, Supplier 2="RS Components", Supplier 3=Farnell, Supplier 4=Mouser, Supplier 5=Digi-Key, Supplier 6=LCSC, Supplier Part Number 3=2302581, Supplier Part Number 4=667-ERJ-2RKF3300X, Supplier Part Number 5=P330LCT-ND
RJ1 RJ2: library part CMP-009-00121-2, Max Operating Temperature=155°C, Min Operating Temperature=-55°C, Pins=2
SD1: library part CMP-2000-05848-1, "MicroSD(TM), Pitch 1.1 mm, 8 Position, Height 1.88 mm, -20 to 85 degC, RoHS, Tape and Reel", Manufacturer=Molex, Package Description="MicroSD(TM), Pitch 1.1 mm, 8 Position, Height 1.88 mm", Datasheet URL=http://www.molex.com/pdm_docs/sd/473521001_sd.pdf, Datasheet Version="Rev. G, 01/2012", Manufacturer URL=http://www.molex.com/, Mounting Technology=SurfaceMount, Package Reference=473521001
U1: "Low-power monitor and protector for 2S to 7S with high accuracy cell voltage measurement 20-VQFN -40 to 110", Manufacturer_Name="Texas Instruments", Copyright="Copyright (C) 2026 Ultra Librarian. All rights reserved.", Manufacturer_Part_Number=BQ76907RGRR, RefDes=RefDes, Type="Power Management"
U2: library part CMP-04918-000626-1, "3-V TO 65-V, 0.6-A BUCK CONVERTE"
U3: "3.3-V CAN FD transceiver with flexible IO and standby mode 8-SOIC -40 to 125", Manufacturer_Name="Texas Instruments", Copyright="Copyright (C) 2026 Ultra Librarian. All rights reserved.", Datasheet=https://www.ti.com/lit/gpn/tcan3413, Manufacturer_Part_Number=TCAN3413DR, RefDes=RefDes, Type=Type
U5: "Mainstream Arm Cortex-M4 MCU 170 MHz with 128 Kbytes of Flash memory, Math Accelerator, Medium Analog level integration", Manufacturer_Name=STMicroelectronics, Copyright="Copyright (C) 2026 Ultra Librarian. All rights reserved.", Datasheet=https://www.st.com/resource/en/datasheet/stm32g431c6.pdf, Manufacturer_Part_Number=STM32G431KBT3, RefDes=RefDes, Type=Type

## Nets (pads, with @x,y where several pads share a name; then routed paths per layer and width w, separated by ;. In a path a pad name is that pad's centre, name@x,y a point inside that pad or via, vN(x,y) a via of type N, cw(c..) or ccw(c..) an arc to the next point about the centre after c; other vN are vias at no path point)
3v3: C5.1 FB1.1 FL1.15 FL1.16 L1.2 R1.2 R23.2 R24.1 R25.1 R26.2 U3.3 U3.5 U5.1 U5.15 U5.17 | length 550.7
  Top Layer w10: FB1.1 3286.5,3350 3420.5,3216 3552,3216 U3.3 3564,3204 3680,3204 3724,3160 U3.5
ALERT: R10.1 U1.14
BAT: C8.1 C9.1 R5.2 U1.17
BQ_SCL: R13.1 U1.12
BQ_SDA: R12.1 U1.13
CAN_RX: U3.4
CAN_STB: U3.8
CAN_TX: U3.1
CANH: D1.2 R3.2 R21.2 | length 271.6
  Top Layer w10: D1.2 3112.36,3335.87 3112.36,3316.59 3138.86,3290.1 3138.86,3266.89 3142.72,3263.03 ; 3142.72,3265 3142.72,3263.03 ; R3.2 3271.89,3247.2 3271.89,3239.77 3259.32,3227.2 3178.54,3227.2 3142.72,3263.03
CANL: D1.1 R22.1 U3.6
GND: C1.1 C3.2 C4.2 C5.2 C6.2 C7.2 C22.2 C23.2 D1.3 FL1.17 LED1.1 R2.1 RJ2.2 SD1.6 SD1.10 SD1.11 SD1.12 SD1.13 U2.1 U2.9 U3.2 U5.14 U5.16 U5.31 U5.32 | length 70
  Top Layer w10: C6.2 C7.2
NetC1_2: C1.2 U2.7
NetC2_1: C2.1 L1.1 U2.5
NetC2_2: C2.2 U2.6
NetC6_1: C6.1 C7.1 FB1.2 SD1.4 | length 70
  Top Layer w10: C6.1 C7.1
NetC16_1: C16.1 R10.2 R12.2 R13.2 U1.15
NetC18_1: C18.1 C19.1 R18.2 U1.6
NetC18_2: C18.2 C19.2 R19.2 U1.7
NetC22_1: C22.1 R21.1 R22.2
NetC23_1: C23.1 R26.1 U5.4
NetCR1_1: CR1.1 R4.1
NetCR1_2: CR1.2 CR2.2 J1.8 R6.1
NetCR2_1: CR2.1 R5.1
NetD2_1: D2.1 U5.8
NetD2_2: D2.2 R25.2
NetJ1_1: J1.1 R17.1 R18.1 R20.1 RJ1.2
NetJ1_2: J1.2 R15.1
NetJ1_3: J1.3 R14.1
NetJ1_4: J1.4 R11.1
NetJ1_5: J1.5 R9.1
NetJ1_6: J1.6 R8.1
NetJ1_7: J1.7 R7.1
NetLED1_2: LED1.2 R23.1
NetLED2_1: LED2.1 U5.7
NetLED2_2: LED2.2 R24.2
NetR1_1: R1.1 R2.2 U2.8
NetR3_1: R3.1 U3.7
NetR16_2: R16.2 U1.8
PACK-: R19.1 R20.2
REGSRC: C17.1 R4.2 U1.16
SD_CD: FL1.1 SD1.9
SD_CS: FL1.13 SD1.2
SD_MISO: FL1.10 SD1.7
SD_MOSI: FL1.12 SD1.3
SD_SCK: FL1.11 SD1.5
VBAT: C3.1 C4.1 U2.3 U2.4
VC0: C15.2 C20.1 C21.1 R15.2 R17.2 U1.4 U1.5
VC2: C14.2 C15.1 R14.2 U1.3
VC3: C13.2 C14.1 R11.2 U1.2
VC4: C12.2 C13.1 R9.2 U1.1
VC5: C11.2 C12.1 R8.2 U1.20
VC6: C10.2 C11.1 R7.2 U1.19
VC7: C10.1 R6.2 U1.18
VSS: C8.2 C9.2 C16.2 C17.2 C20.2 C21.2 R16.1 RJ1.1 RJ2.1 U1.11 U1.21
pads on no net: FL1.2 FL1.3 FL1.4 FL1.5 FL1.6 FL1.7 FL1.8 FL1.9 FL1.14 SD1.1 SD1.8 U1.9 U1.10 U2.2 U5.2 U5.3 U5.5 U5.6 U5.9 U5.10 U5.11 U5.12 U5.13 U5.18 U5.19 U5.20 U5.21 U5.22 U5.23 U5.24 U5.25 U5.26 U5.27 U5.28 U5.29 U5.30

## Silkscreen, mask and mechanical layers (free items; w line width, h text height)
Top Overlay:
  drawing of 17 lines, arcs and shapes, not listed
Mechanical 1:
  the board outline again, w10

## Text inside footprints (layer, text, board x,y; h text height)
CR1: Top Overlay "*" at 5685,3236.13 h50 r90; Mechanical 13 "*" at 5685,3277 h50 r90
CR2: Top Overlay "*" at 6015,3222.56 h50 r90; Mechanical 13 "*" at 6015,3263.44 h50 r90
R20: Top Overlay "REFDES" at 4815,3702.5 h50 r90; Top Overlay "RefDes" at 4815,3715 h50 r90; Mechanical 13 "RefDes2" at 4815,3702.5 h50 r90
U1: Top Overlay "*" at 3078.69,3079.22 h50; Mechanical 13 "*" at 3135.5,3079.22 h50
U3: Top Overlay "*" at 3535.5,3327 h50; Mechanical 13 "*" at 3579,3281.5 h50
U5: Top Overlay "*" at 3921.41,3785.44 h50 r45; Mechanical 13 "*" at 3921.41,3785.44 h50 r45